# Altium PCB PCB_Interface_Board_7500-0428.PcbDoc (part 2 of 5)
Units mil, origin at the board's own origin, x right, y up, seen from the top; angles counter-clockwise.
Board outline 3850 x 4150 mil, 4 copper layers (Top Layer 1, GND+Signal, PWR+Signal, Bottom Layer 1), stack 62.449 mil thick; 247 components, 137 nets, 1675 pads, 241 vias.
Unrouted connection lines stored in the file: 122.
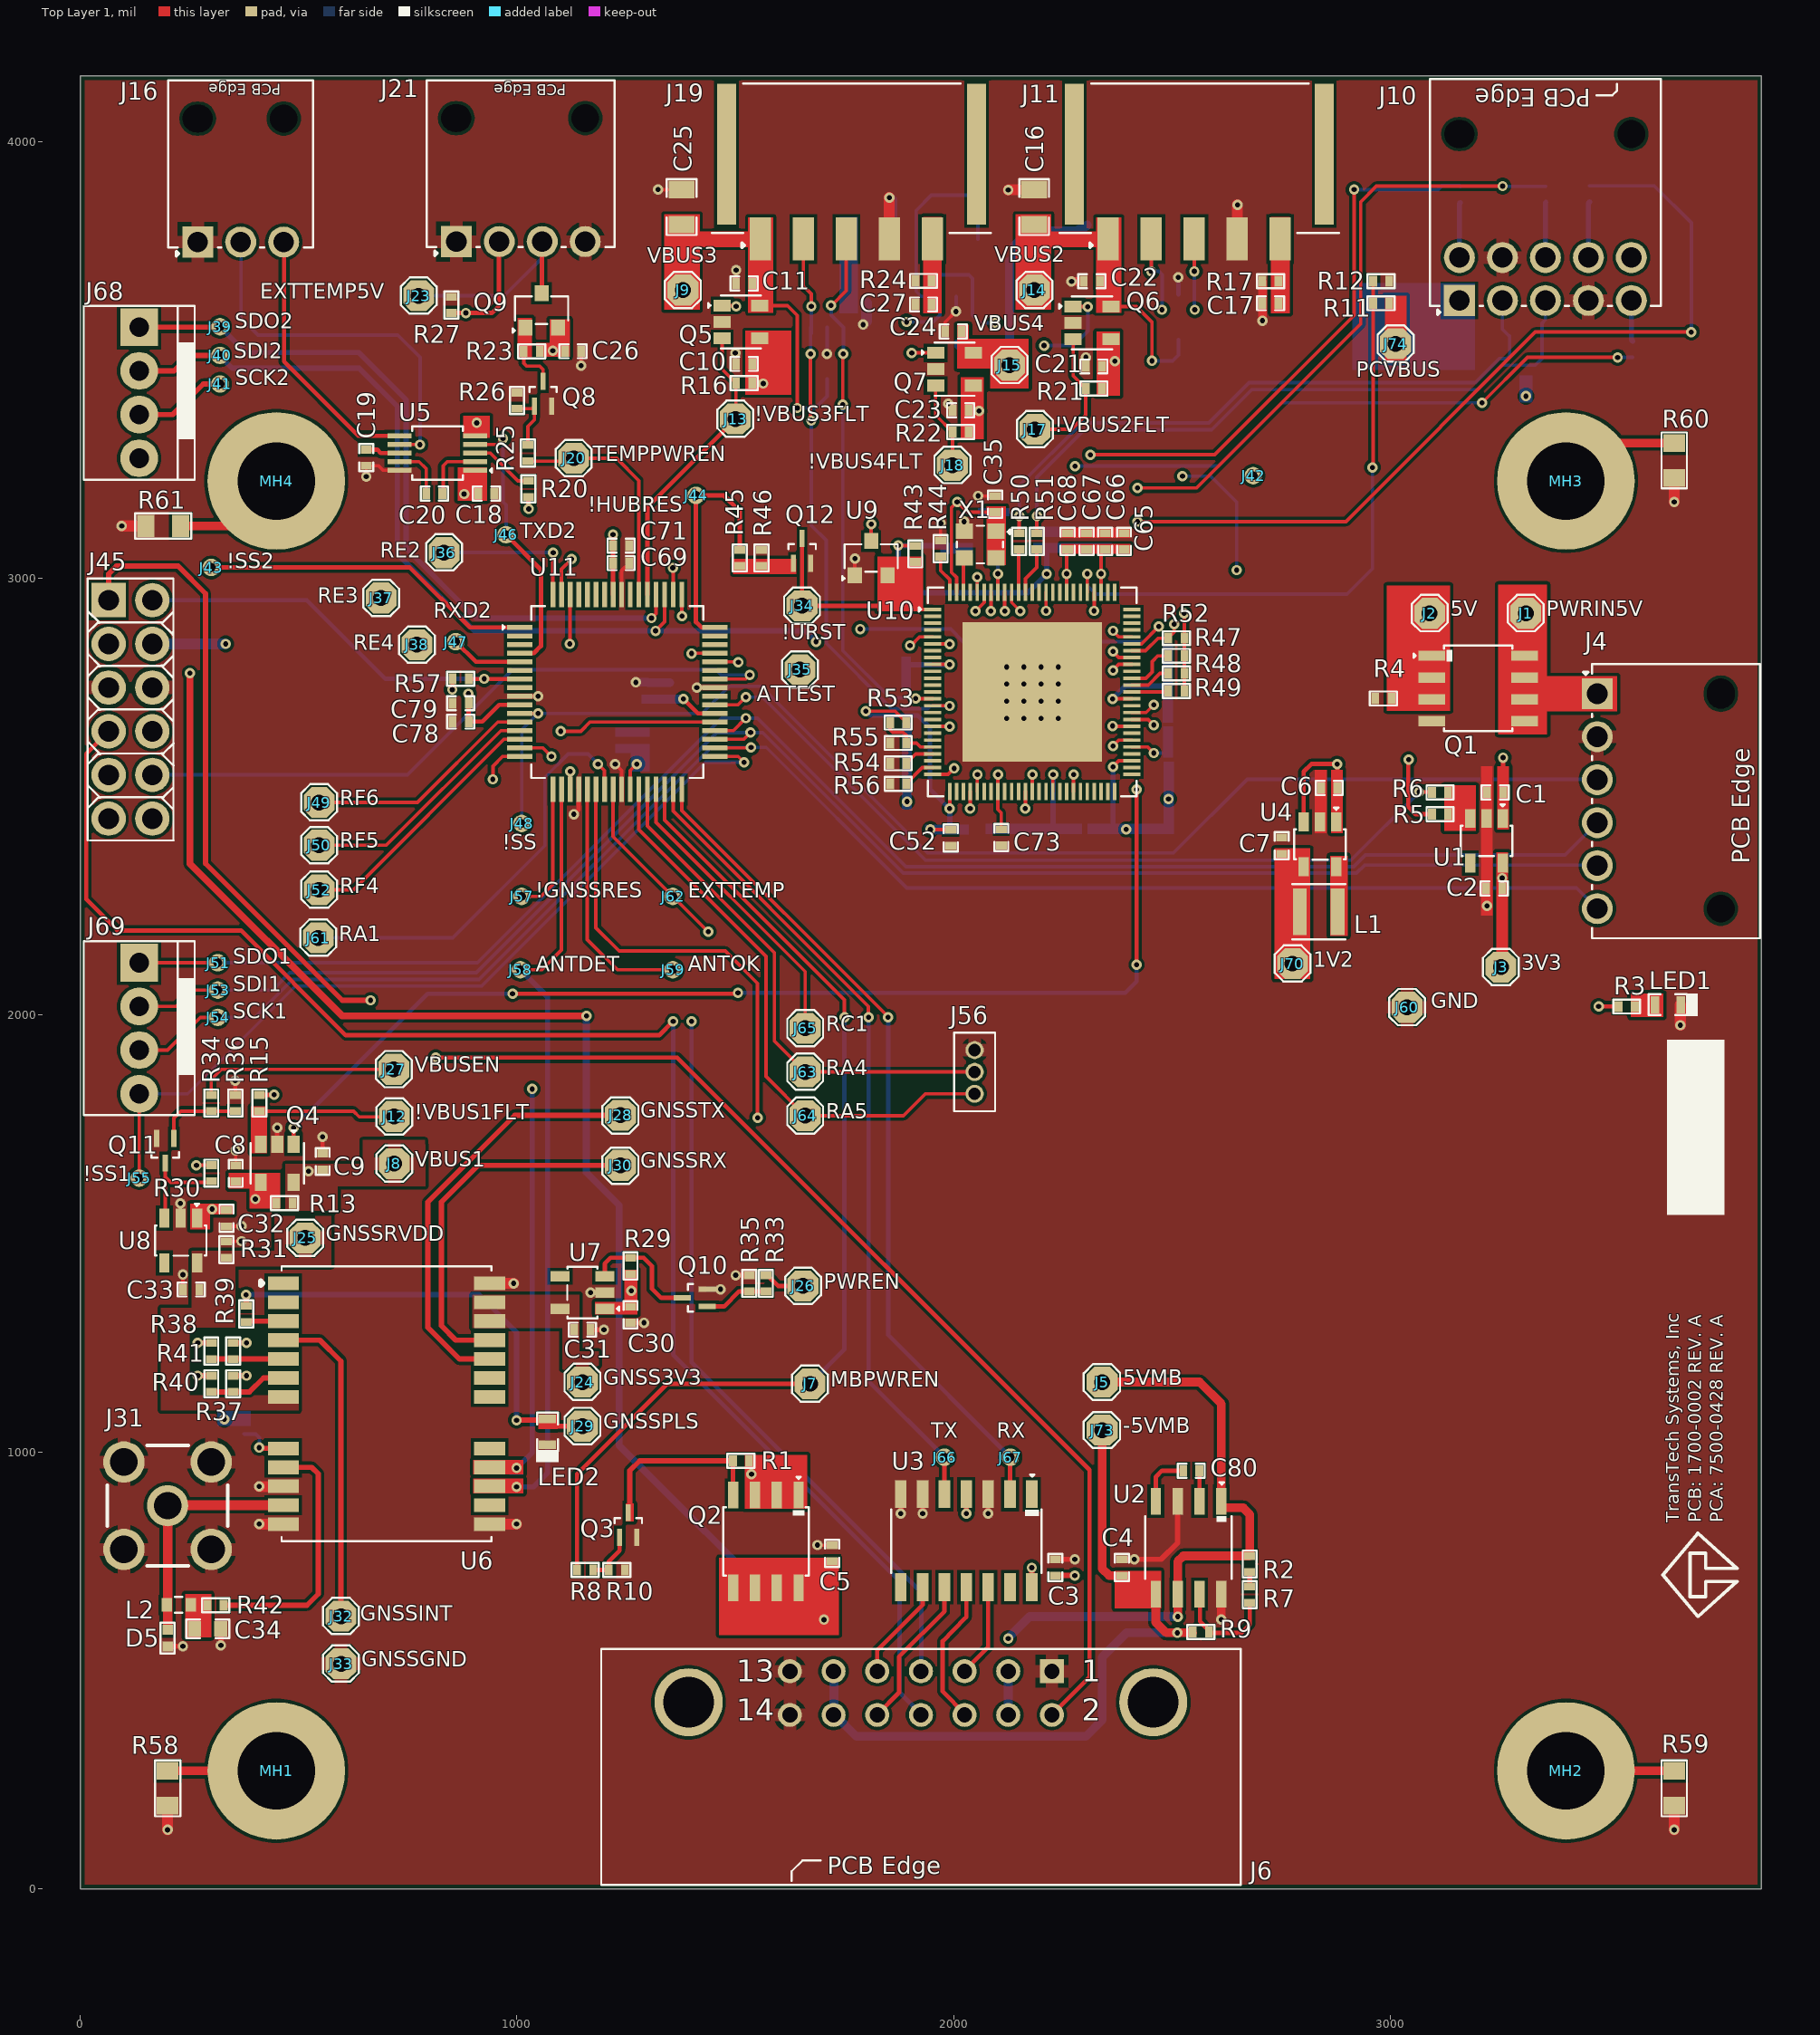
[diagram p0: Top Layer 1 view]

## Part data (continued)
J21: "CONN HEADER R/A 4POS 2.5MM", Current Rating=8A, Insulation Color=Black, Manufacturer=Molex, Max Operating Temperature=105°C, Min Operating Temperature=-40°C, Supplier Part Number=538-105313-1304, Voltage Rating=250V, ComponentLink1Description=http://www.farnell.com/datasheets/2788568.pdf?src-supplier=Farnell, ComponentLink1URL=http://www.farnell.com/datasheets/2788568.pdf?src-supplier=Farnell, ComponentLink2Description=http://www.farnell.com/datasheets/2788568.pdf?src-supplier=Newark, ComponentLink2URL=http://www.farnell.com/datasheets/2788568.pdf?src-supplier=Newark, ComponentLink3Description=https://www.molex.com/pdm_docs/sd/1053131102_sd.pdf?src-supplier=Digikey, ComponentLink3URL=https://www.molex.com/pdm_docs/sd/1053131102_sd.pdf?src-supplier=Digikey, Connector Type=Header, Contact Finish - Mating=GOLD, Contact Material=Brass, Contact Shape=Square, Contact Type="Male Pin", Fastening Type=Latch, Height=6.84mm, Insulation Material=Polymer, Item Type=Header, Manufacturer Part Number=105313-1304, Mounting Technology="Through Hole", Number of Circuits=4NUMBER, Number of Contacts=4NUMBER, Number of Positions=4, Number of Rows=1, Orientation=5492OrientationType, Packaging=Tray, Plating=154ConductorMaterial, Pricing="1=1.61, 10=1.45, 50=1.45, 100=1.26, 1000=1.11, 10000=1.11 (USD)", RoHS=Yes, RoHS Compliant=Yes, Series="Nano-Fit 105313", Stock=4079, Supplier=Mouser, Termination=Solder
J31: "CONN SMA JACK STR 50 OHM PCB", Frequency=20GHz, Manufacturer=Samtec, ComponentLink1Description=https://datasheet.ciiva.com/646/sma-j-p-x-st-th1-mkt-646059.pdf?src-supplier=Digikey, ComponentLink1URL=https://datasheet.ciiva.com/646/sma-j-p-x-st-th1-mkt-646059.pdf?src-supplier=Digikey, Item Type="RF / Coaxial Connectors", Manufacturer Part Number=SMA-J-P-H-ST-TH1, Number of Contacts=1NUMBER, Pricing="1=5.81, 25=5.03, 50=4.25 (USD)", RoHS=Yes, Stock=32413, Supplier="Arrow Electronics", Supplier Part Number=SMA-J-P-H-ST-TH1
J45: "2.54mm Pitch C-Grid III Header, Dual Row, Vertical, 12 Circuits, 0.10µm Gold (Au) Selective Plating", Color=Black, Flammability Rating="UL94 V-0", Manufacturer=Molex, Supplier Part Number=WM20588-ND, Category=Uncategorized, ComponentLink1Description=https://www.molex.com/pdm_docs/ps/PS-99020-0001-001.pdf?src-supplier=Digikey, ComponentLink1URL=https://www.molex.com/pdm_docs/ps/PS-99020-0001-001.pdf?src-supplier=Digikey, ComponentLink2Description=http://www.molex.com/pdm_docs/sd/901311086_sd.pdf?src-supplier=Digikey, ComponentLink2URL=http://www.molex.com/pdm_docs/sd/901311086_sd.pdf?src-supplier=Digikey, Contact Finish - Mating=GOLD, Contact Material=Brass, Contact Mating Length=0.266inch, Contact Plating=Gold, Contact Shape=Square, Contact Type="Male Pin", Fastening Type=Pull, Insulation Color=Black, Insulation Material=Glass, Item Type=Header, Manufacturer Part Number=0901311086, Mounting Technology="Through Hole", Number of Positions=12, Number of Rows=2, Packaging=Bulk, Pitch=0.1inch, Pricing="1=1.44, 10=1.224, 80=1.01075, 1200=0.79795, 6000=0.70752, 10800=0.69156 (USD)", RoHS=Yes, RoHS Compliant=Yes, Row Spacing=0.1inch, Series="C-Grid III™ 90131", Stock=1766, Supplier=Digikey, Termination=Solder
J56: "CONN HEADER VERT 3POS 1.27MM", Flammability Rating="UL94 V-0", Manufacturer=Sullins, Max Operating Temperature=105°C, Min Operating Temperature=-40°C, Supplier Part Number=S9014E-03-ND, ComponentLink1Description=https://datasheet.ciiva.com/726/71-grpb-1vwvn-rc-10957-c-726649.pdf?src-supplier=Digikey, ComponentLink1URL=https://datasheet.ciiva.com/726/71-grpb-1vwvn-rc-10957-c-726649.pdf?src-supplier=Digikey, Connector Type=Header, Contact Finish - Mating=GOLD, Contact Material=Brass, Contact Shape=Square, Contact Type="Male Pin", Fastening Type=Pull, Insulation Material=Nylon, Item Type=Connectors, Lead Free="Lead Free", Manufacturer Part Number=GRPB031VWVN-RC, Mounting Technology="Through Hole", Number of Positions=3, Number of Rows=1, Packaging=Bulk, Pitch=1.27mm, Pricing="1=0.28, 10=0.238, 100=0.185, 500=0.15862, 1000=0.13218, 5000=0.1133, 10000=0.1079 (USD)", RoHS=Yes, RoHS Compliant=Yes, Series=-, Stock=29991, Supplier=Digikey, Termination=Solder
J68 J69: "CONN HEADER VERT 4POS 2.54MM", Manufacturer=Molex, Supplier Part Number=WM10288-ND, ComponentLink1Description=https://datasheet.ciiva.com/24135/1718561004-pcb-headers-295430-24135941.pdf?src-supplier=Mouser, ComponentLink1URL=https://datasheet.ciiva.com/24135/1718561004-pcb-headers-295430-24135941.pdf?src-supplier=Mouser, ComponentLink2Description=https://datasheet.ciiva.com/29151/1718560002-sd-29151999.pdf?src-supplier=Digikey, ComponentLink2URL=https://datasheet.ciiva.com/29151/1718560002-sd-29151999.pdf?src-supplier=Digikey, Item Type=Header, Manufacturer Part Number=1718561004, Pricing="1=0.73, 10=0.617, 100=0.4796, 4000=0.34254, 8000=0.30829, 12000=0.30372 (USD)", RoHS=Yes, Supplier=Digikey
L1: library part NR3012T2R2M, "FIXED IND 2.2UH 1.2A 96 MOHM SMD", LCSC Part Number=C525010, Manufacturer="Taiyo Yuden", Supplier Part Number 1=587-1642-1-ND, ComponentLink1Description=https://datasheet.ciiva.com/8499/nr3012t2r2m-ss-8499238.pdf?src-supplier=Avnet, ComponentLink1URL=https://datasheet.ciiva.com/8499/nr3012t2r2m-ss-8499238.pdf?src-supplier=Avnet, ComponentLink2Description=https://datasheet.ciiva.com/1043/wound04-e-1043497.pdf?src-supplier=Digikey, ComponentLink2URL=https://datasheet.ciiva.com/1043/wound04-e-1043497.pdf?src-supplier=Digikey, ComponentLink3Description=https://datasheet.ciiva.com/1043/wound04-e-1043498.pdf?src-supplier=Digikey, ComponentLink3URL=https://datasheet.ciiva.com/1043/wound04-e-1043498.pdf?src-supplier=Digikey, ComponentLink4Description=https://datasheet.ciiva.com/1043/wound04-e-1043499.pdf?src-supplier=Digikey, ComponentLink4URL=https://datasheet.ciiva.com/1043/wound04-e-1043499.pdf?src-supplier=Digikey, ComponentLink5Description=https://datasheet.ciiva.com/8002/wound04-e-8002122.pdf?src-supplier=Element14, ComponentLink5URL=https://datasheet.ciiva.com/8002/wound04-e-8002122.pdf?src-supplier=Element14, Item Type=Inductors, Manufacturer Part Number=NR3012T2R2M, Pricing 1="1=0.24, 10=0.196, 25=0.1812, 50=0.166, 100=0.1463, 250=0.14184, 500=0.12674, 1000=0.10625 (USD)", RoHS=Yes, Stock 1=5366, Supplier 1=Digikey
L2: library part B82496C3270J000, "FIXED IND 27NH 360MA 550MOHM SMD", LCSC Part Number=C2046375, Manufacturer="TDK EPCOS", Supplier Part Number 1=495-2029-1-ND, ComponentLink1Description=https://datasheet.ciiva.com/22704/78400-22704383.pdf?src-supplier=Element14, ComponentLink1URL=https://datasheet.ciiva.com/22704/78400-22704383.pdf?src-supplier=Element14, ComponentLink2Description=https://datasheet.ciiva.com/22684/78400-22684183.pdf?src-supplier=Element14, ComponentLink2URL=https://datasheet.ciiva.com/22684/78400-22684183.pdf?src-supplier=Element14, Item Type=Inductor, Manufacturer Part Number=B82496C3270J000, Pricing 1="1=0.36, 10=0.291, 25=0.2688, 50=0.2464, 100=0.2172, 250=0.21052, 500=0.18814, 1000=0.1523 (USD)", RoHS=Yes, Stock 1=40469, Supplier 1=Digikey
LED1: library part NCD0603R3, "RED LED 0603 Light Emitting Diodes", LCSC Part Number=C3151730, Manufacturer="Foshan NationStar Optoelectronics", Package=0603, ComponentLink1Description=LCSC, ComponentLink1URL=https://www.lcsc.com/product-detail/Light-Emitting-Diodes-LED_Foshan-NationStar-Optoelectronics-NCD0603R3_C3151730.html, Item Type=LED, Manufacturer Part Number=NCD0603R3
LED2: library part NCD0603G2, "Emerald 0603 Light Emitting Diodes (LED) ROHS", LCSC Part Number=C87326, Manufacturer="Foshan NationStar Optoelectronics", Package=0603, ComponentLink1Description=LCSC, ComponentLink1URL=https://www.lcsc.com/product-detail/Light-Emitting-Diodes-LED_Foshan-NationStar-Optoelectronics-NCD0603G2_C87326.html, Item Type=LED, Manufacturer Part Number=NCD0603G2
MH1 MH2 MH3 MH4: "-", Item Type="Mounting Hole", Manufacturer Part Number="M4 Mounting Hole"
Q1 Q2: "20V 11.5A 12mΩ@11.5A,4.5V 1W 1.5V@250uA 1PCSPChannel SOIC-8 MOSFETs ROHS", Case/Package=SOIC, Continuous Drain Current (ID)=-11.5A, Drain to Source Breakdown Voltage=-20V, Drain to Source Resistance=10mR, Gate to Source Voltage (Vgs)=12V, LCSC Part Number=C3279922, Manufacturer="ON Semiconductor / Fairchild", Max Operating Temperature=150°C, Min Operating Temperature=-55°C, Package Quantity=2500, Power Dissipation=2.5W, ComponentLink1Description=http://components.arrow.com/part/dataview/3004105S7561270N7769?src-supplier=Arrow+Electronics, ComponentLink1URL=http://components.arrow.com/part/dataview/3004105S7561270N7769?src-supplier=Arrow+Electronics, Fall Time=60ns, Item Type=MOSFETs, Manufacturer Part Number=SI4463DY, Packaging="Tape and Reel", Pins=8, Polarity=P-CHANNEL, Pricing="472=0.62 (GBP)", Rise Time=15ns, RoHS=Yes, RoHS Compliant=Yes, Stock=188616, Supplier=Farnell, Turn-Off Delay Time=120ns
Q3 Q8 Q10 Q11 Q12: "Small Signal Bipolar Transistor, 0.6A I(C), 40V V(BR)CEO, 1-Element, NPN, Silicon", Manufacturer="ON Semiconductor", Supplier Part Number=MMBT2222ATT3GOSCT-ND, Category=BJTs, ComponentLink1Description=https://datasheet.ciiva.com/980/mmbt2222lt1-d-980718.pdf?src-supplier=Digikey, ComponentLink1URL=https://datasheet.ciiva.com/980/mmbt2222lt1-d-980718.pdf?src-supplier=Digikey, ComponentLink2Description=https://datasheet.ciiva.com/4724/mmbt2222att1-d-81771-4724629.pdf?src-supplier=Mouser, ComponentLink2URL=https://datasheet.ciiva.com/4724/mmbt2222att1-d-81771-4724629.pdf?src-supplier=Mouser, Manufacturer Part Number=MMBT2222ATT3G, Pricing="1=0.12, 10=0.082, 100=0.0441, 500=0.03466, 1000=0.02407, 2000=0.01994, 5000=0.01885 (USD)", RoHS=Yes, Stock=7029, Supplier=Digikey
Q4 Q5 Q6 Q7: "USBPOWERSWITCHTSOT25T&R3K", Manufacturer=Diodes, Supplier Part Number=31-AP22816BKAWT-7CT-ND, Item Type=IC, Manufacturer Part Number=AP22816BKAWT-7, Number of Channels=1NUMBER, Pricing="1=0.31, 10=0.248, 25=0.2264, 100=0.1686, 250=0.15276, 500=0.12644, 1000=0.09483 (USD)", RoHS=No, Stock=8685, Supplier=Digikey
Q9: "Transistor MOSFET P-CH 20V 3.1A 3-Pin SOT-23", Continuous Drain Current (ID)=-2.3A, Drain to Source Breakdown Voltage=-20V, Drain to Source Resistance=90mR, Gate to Source Voltage (Vgs)=8V, Manufacturer=Vishay, Max Operating Temperature=150°C, Min Operating Temperature=-55°C, Power Dissipation=860mW, Supplier Part Number=742-SI2301CDS-T1-BE3CT-ND, Category=MOSFETs, Drain to Source Voltage (Vdss)=-20V, Height=1.12mm, Manufacturer Part Number=SI2301CDS-T1-BE3, Number of Channels=1NUMBER, Pricing="1=0.37, 10=0.289, 100=0.1734, 500=0.1606, 1000=0.1092 (USD)", RoHS=Yes, Stock=6842, Supplier=Digikey, Turn-Off Delay Time=30ns, Turn-On Delay Time=11ns
R1 R2 R4 R10 R15 R16 R20 R21 R22 R23 R26 R29 R30 R31 R35 R36 R46 R47 R48 R49 R52 R53 R55 R56 R57: library part RT0402BRD0710KL, "RES SMD 10K OHM 0.1% 1/16W 0402", LCSC Part Number=C190095, Manufacturer=Yageo, Supplier Part Number=1236728, Category="Chip SMD Resistors", ComponentLink1Description=https://datasheet.ciiva.com/12836/pyu-rt-1-to-0-05-rohs-l-4-12836454.pdf?src-supplier=Mouser, ComponentLink1URL=https://datasheet.ciiva.com/12836/pyu-rt-1-to-0-05-rohs-l-4-12836454.pdf?src-supplier=Mouser, Item Type=Resistor, Manufacturer Part Number=RT0402BRD0710KL, Pricing="10000=0.0218, 20000=0.0213, 30000=0.021, 50000=0.0206, 100000=0.0199 (USD)", RoHS=Yes, Stock=490000, Supplier="Future Electronics"
R3: library part ERJ-2GEJ132X, "RES SMD 1.3K OHM 5% 1/10W 0402"
R5 R6 R13 R50 R51: library part RCS04020000Z0ED, "RES SMD 0 OHM JUMPER 1/5W 0402", Case Code (Imperial)=0402, Case Code (Metric)=1005, LCSC Part Number=C844673, Manufacturer="Vishay Dale", Max Operating Temperature=155°C, Max Power Dissipation=200mW, Min Operating Temperature=-55°C, Resistance=0mR, Resistor Type="Thick Film", Supplier Part Number 1=541-2877-1-ND, Case/Package=0402, ComponentLink1Description=http://www.farnell.com/datasheets/2618474.pdf?src-supplier=Farnell, ComponentLink1URL=http://www.farnell.com/datasheets/2618474.pdf?src-supplier=Farnell, ComponentLink2Description=http://www.farnell.com/datasheets/2618474.pdf?src-supplier=Element14, ComponentLink2URL=http://www.farnell.com/datasheets/2618474.pdf?src-supplier=Element14, ComponentLink3Description=http://www.vishay.com/docs/20065/rcse3.pdf?src-supplier=Digi-Key, ComponentLink3URL=http://www.vishay.com/docs/20065/rcse3.pdf?src-supplier=Digi-Key, ComponentLink4Description=http://www.farnell.com/datasheets/2618474.pdf?src-supplier=Newark, ComponentLink4URL=http://www.farnell.com/datasheets/2618474.pdf?src-supplier=Newark, Features="Automotive AEC-Q200", Height=0.016inch, Item Type=Resistor, Length=0.039inch, Manufacturer Part Number=RCS04020000Z0ED, Number of Terminations=2, Packaging="Tape and Reel", Pricing 1="1=0.1, 10=0.083, 25=0.0576, 50=0.0448, 100=0.032, 250=0.02496, 500=0.01984, 1000=0.01408, 5000=0.01088 (USD)", RoHS Compliant=Yes, Stock 1=35470, Supplier 1=Digi-Key, Width=0.02inch
R7 R9 R43: library part RT0402BRD07100KL, "RES SMD 100K OHM 0.1% 1/16W 0402", LCSC Part Number=C852472, Manufacturer=Yageo, Supplier Part Number=YAG1343CT-ND, Voltage Rating (DC)=50V, Category="Chip SMD Resistors", ComponentLink1Description=https://datasheet.ciiva.com/12724/pyu-rt-1-to-0-05-rohs-l-4-12724954.pdf?src-supplier=Mouser, ComponentLink1URL=https://datasheet.ciiva.com/12724/pyu-rt-1-to-0-05-rohs-l-4-12724954.pdf?src-supplier=Mouser, Item Type=Resistor, Manufacturer Part Number=RT0402BRD07100KL, Pricing="1=0.16, 10=0.121, 50=0.0958, 100=0.0859, 500=0.0654, 1000=0.0578, 5000=0.04283 (USD)", RoHS=Yes, Stock=62932, Supplier=Digikey
R8 R25 R33 R34 R45: library part RC0402FR-071KL, "RES 1K OHM 1% 1/16W 0402", Case Code (Imperial)=0402, Case Code (Metric)=1005, LCSC Part Number=C106235, Manufacturer=Yageo, Max Operating Temperature=155°C, Max Power Dissipation=63mW, Min Operating Temperature=-55°C, Power Rating=62.5mW, Resistance=1kR, Resistance Tolerance=1%, Resistor Type="Thick Film", Temperature Coefficient=100ppm/°C, Voltage Rating=50V, Case/Package=0402, Category="Chip SMD Resistors", ComponentLink1Description=https://datasheet.ciiva.com/11819/0900766b80c66297-11819477.pdf?src-supplier=RSComponents, ComponentLink1URL=https://datasheet.ciiva.com/11819/0900766b80c66297-11819477.pdf?src-supplier=RSComponents, ComponentLink2Description=https://datasheet.ciiva.com/7983/1018594-7983502.pdf?src-supplier=Element14, ComponentLink2URL=https://datasheet.ciiva.com/7983/1018594-7983502.pdf?src-supplier=Element14, ComponentLink3Description=https://datasheet.ciiva.com/22747/1018594-22747513.pdf?src-supplier=Element14, ComponentLink3URL=https://datasheet.ciiva.com/22747/1018594-22747513.pdf?src-supplier=Element14, ComponentLink4Description=https://datasheet.ciiva.com/12666/pyu-rc0402-51-rohs-l-6-r-12666741.pdf?src-supplier=Mouser, ComponentLink4URL=https://datasheet.ciiva.com/12666/pyu-rc0402-51-rohs-l-6-r-12666741.pdf?src-supplier=Mouser, ComponentLink5Description=https://datasheet.ciiva.com/7849/1018594-7849869.pdf?src-supplier=Element14, ComponentLink5URL=https://datasheet.ciiva.com/7849/1018594-7849869.pdf?src-supplier=Element14, ComponentLink6Description=https://datasheet.ciiva.com/7849/1018594-7849871.pdf?src-supplier=Element14, ComponentLink6URL=https://datasheet.ciiva.com/7849/1018594-7849871.pdf?src-supplier=Element14, ComponentLink7Description=https://datasheet.ciiva.com/17063/pyu-rc0402-51-rohs-l-6-r-17063193.pdf?src-supplier=Future+Electronics, ComponentLink7URL=https://datasheet.ciiva.com/17063/pyu-rc0402-51-rohs-l-6-r-17063193.pdf?src-supplier=Future+Electronics, Construction=Rectangular, Depth=0.5mm, Features="Moisture Resistant", Height=0.32mm, Item Type=Resistor, Lead Free="Lead Free", Length=1mm, Manufacturer Part Number=RC0402FR-071KL, Military Standard=Not, Number of Pins=2, Number of Terminations=2, Packaging="Tape and Reel", Pricing 1="10000=0.00085, 20000=0.00087, 40000=0.00084, 60000=0.00083, 80000=0.00079, 100000=0.00078, 1000000=0.00076 (USD)", Reach SVHC Compliant=Yes, RoHS=Yes, RoHS Compliant=Yes, Series=RC, Size Code=0402, Stock 1=13030000, Supplier 1=Avnet, Supplier Part Number 1=RC0402FR-071KL, Technology="THICK FILM", Termination=SMD/SMT, Tolerance=1%, Voltage Rating (DC)=50V, Width=0.5mm
R11: library part RC0402FR-0743KL, "RES 43K OHM 1% 1/16W 0402", Case Code (Imperial)=0402, Case Code (Metric)=1005, LCSC Part Number=C185415, Manufacturer=Yageo, Max Operating Temperature=155°C, Max Power Dissipation=63mW, Min Operating Temperature=-55°C, Package Quantity=1, Resistance=43kR, Resistance Tolerance=1%, Resistor Type="Thick Film", Supplier Part Number 1=311-43.0KLRCT-ND, Temperature Coefficient=100ppm/°C, Voltage Rating=50V, Case/Package=0402, Category="Chip SMD Resistors", ComponentLink1Description=https://datasheet.ciiva.com/11819/0900766b80c66297-11819515.pdf?src-supplier=RSComponents, ComponentLink1URL=https://datasheet.ciiva.com/11819/0900766b80c66297-11819515.pdf?src-supplier=RSComponents, ComponentLink2Description=https://datasheet.ciiva.com/7850/1018594-7850009.pdf?src-supplier=Element14, ComponentLink2URL=https://datasheet.ciiva.com/7850/1018594-7850009.pdf?src-supplier=Element14, ComponentLink3Description=https://datasheet.ciiva.com/7850/1018594-7850008.pdf?src-supplier=Element14, ComponentLink3URL=https://datasheet.ciiva.com/7850/1018594-7850008.pdf?src-supplier=Element14, ComponentLink4Description=https://datasheet.ciiva.com/2453/pyu-r-int-thick-7-2453665.pdf?src-supplier=Digi-Key, ComponentLink4URL=https://datasheet.ciiva.com/2453/pyu-r-int-thick-7-2453665.pdf?src-supplier=Digi-Key, ComponentLink5Description=https://datasheet.ciiva.com/2453/pyu-r-int-thick-7-2453666.pdf?src-supplier=Digi-Key, ComponentLink5URL=https://datasheet.ciiva.com/2453/pyu-r-int-thick-7-2453666.pdf?src-supplier=Digi-Key, ComponentLink6Description=https://datasheet.ciiva.com/2453/pyu-r-int-thick-7-2453664.pdf?src-supplier=Digi-Key, ComponentLink6URL=https://datasheet.ciiva.com/2453/pyu-r-int-thick-7-2453664.pdf?src-supplier=Digi-Key, Construction=Rectangular, Depth=0.5mm, Features="Moisture Resistant", Height=0.016inch, Item Type=Resistor, Lead Free="Lead Free", Length=1mm, Manufacturer Part Number=RC0402FR-0743KL, Military Standard=Not, Number of Terminations=2, Packaging="Tape and Reel", Power Rating=63mW, Pricing 1="1=0.10000, 10=0.01400, 100=0.00580, 1000=0.00262, 2500=0.00228, 5000=0.00188 (USD)", RoHS=Yes, RoHS Compliant=Yes, Series=RC, Size Code=0402, Stock 1=923044, Supplier 1=Digi-Key, Technology="THICK FILM", Termination=SMD/SMT, Tolerance=1%, Voltage Rating (DC)=50V, Weight=2.3E-05oz, Width=0.02inch
R12: library part RC0402FR-0749K9L, "RES 49.9K OHM 1% 1/16W 0402", Case Code (Imperial)=0402, Case Code (Metric)=1005, LCSC Part Number=C137969, Manufacturer=Yageo, Max Operating Temperature=155°C, Max Power Dissipation=63mW, Min Operating Temperature=-55°C, Power Rating=62.5mW, Supplier Part Number=311-49.9KLRCT-ND, Temperature Coefficient=100ppm/°C, Tolerance=1%, Voltage Rating=50V, Case/Package=0402, Category="Chip SMD Resistors", ComponentLink1Description=https://datasheet.ciiva.com/17071/pyu-rc0402-51-rohs-l-6-r-17071066.pdf?src-supplier=Future+Electronics, ComponentLink1URL=https://datasheet.ciiva.com/17071/pyu-rc0402-51-rohs-l-6-r-17071066.pdf?src-supplier=Future+Electronics, Construction=Rectangular, Depth=0.5mm, Features="Moisture Resistant", Item Type=Resistor, Lead Free="Lead Free", Length=1mm, Manufacturer Part Number=RC0402FR-0749K9L, Military Standard=Not, Number of Terminations=2, Packaging="Tape and Reel", Pricing="1=0.1, 10=0.015, 50=0.0088, 100=0.0073, 500=0.00488, 1000=0.00417, 5000=0.00297 (USD)", RoHS=Yes, RoHS Compliant=Yes, Series=RC, Stock=5084418, Supplier=Digikey, Termination=SMD/SMT, Voltage Rating (DC)=50V
R17 R24 R28: library part CRCW0402330RFKEDC, "SMD Chip Resistor, 330 Ohm, ± 1%, 63 mW, 0402 [1005 Metric], Thick Film, General Purpose", Case Code (Imperial)=0402, Case Code (Metric)=1005, Manufacturer="Vishay Semiconductors", Max Operating Temperature=155°C, Max Power Dissipation=63mW, Min Operating Temperature=-55°C, Supplier Part Number=541-3996-1-ND, Temperature Coefficient=100ppm/°C, Tolerance=1%, Case/Package=0402, Category="Chip SMD Resistors", ComponentLink1Description=http://www.vishay.com/docs/28773/crcwce3.pdf?src-supplier=Digikey, ComponentLink1URL=http://www.vishay.com/docs/28773/crcwce3.pdf?src-supplier=Digikey, Lead Free="Lead Free", Manufacturer Part Number=CRCW0402330RFKEDC, Number of Terminations=2, Packaging="Tape and Reel", Pricing="1=0.1, 10=0.024, 50=0.0152, 100=0.0127, 500=0.00866, 1000=0.00746, 5000=0.00542 (USD)", RoHS=Yes, RoHS Compliant=Yes, Series=CRCW-C, Stock=59136, Supplier=Digikey
R27: library part RTT021004BTH, "62.5mW Thick Film Resistors ±100ppm/℃ ±0.1% 1MΩ 0402 Chip Resistor - Surface Mount ROHS", LCSC Part Number=C525710, Manufacturer=RALEC, Package=0402, ComponentLink1Description=LCSC, ComponentLink1URL=https://www.lcsc.com/product-detail/Chip-Resistor-Surface-Mount_RALEC-RTT021004BTH_C525710.html, Item Type=Resistor, Manufacturer Part Number=RTT021004BTH
R32: library part RMCF0402FT11K0, "Res Thick Film 0402 11K Ohm 1% 0.063W(1/16W) ±100ppm/C Pad SMD Automotive T/R", Case Code (Imperial)=0402, Case Code (Metric)=1005, Manufacturer="Stackpole Electronics", Max Operating Temperature=155°C, Max Power Dissipation=63mW, Min Operating Temperature=-55°C, Ratings=AEC-Q200, Supplier Part Number=RMCF0402FT11K0DKR-ND, Temperature Coefficient=100ppm/°C, Tolerance=1%, Case/Package=0402, Category="Chip SMD Resistors", ComponentLink1Description=http://components.arrow.com/part/dataview/50581462S9720773N1174?src-supplier=Arrow+Electronics, ComponentLink1URL=http://components.arrow.com/part/dataview/50581462S9720773N1174?src-supplier=Arrow+Electronics, ComponentLink2Description=https://www.seielect.com/catalog/SEI-RMCF_RMCP.pdf?src-supplier=Avnet, ComponentLink2URL=https://www.seielect.com/catalog/SEI-RMCF_RMCP.pdf?src-supplier=Avnet, ComponentLink3Description=https://www.seielect.com/catalog/SEI-Packaging.pdf?src-supplier=Digikey, ComponentLink3URL=https://www.seielect.com/catalog/SEI-Packaging.pdf?src-supplier=Digikey, Contact Plating=Tin,Matte, Features="Automotive AEC-Q200", Height=0.016inch, Lead Free="Lead Free", Length=0.039inch, Manufacturer Part Number=RMCF0402FT11K0, Mounting Technology="Surface Mount", Number of Terminations=2, Packaging="Tape and Reel", Pricing="1=0.1, 10=0.021, 50=0.0116, 100=0.0093, 500=0.00594, 1000=0.005, 5000=0.00345 (USD)", Radiation Hardening=No, RoHS=Yes, RoHS Compliant=Yes, Series=RMCF, Stock=3070, Supplier=Digikey, Width=0.02inch
R37 R38 R40 R41: library part CRGCQ0402F27R, "SMD Chip Resistor, 27 Ohm, ± 1%, 63 mW, 0402 [1005 Metric], Thick Film, General Purpose", Manufacturer="TE Connectivity", Operating Supply Voltage=50V, Power Rating=62.5mW, Supplier Part Number=A129608CT-ND, Category="Chip SMD Resistors", ComponentLink1Description=http://datasheet.octopart.com/CRGCQ0402F27R-TE-Connectivity-datasheet-114679081.pdf?src-supplier=Farnell, ComponentLink1URL=http://datasheet.octopart.com/CRGCQ0402F27R-TE-Connectivity-datasheet-114679081.pdf?src-supplier=Farnell, ComponentLink2Description=http://datasheet.octopart.com/CRGCQ0402F27R-TE-Connectivity-datasheet-114679081.pdf?src-supplier=Mouser, ComponentLink2URL=http://datasheet.octopart.com/CRGCQ0402F27R-TE-Connectivity-datasheet-114679081.pdf?src-supplier=Mouser, ComponentLink3Description=http://datasheet.octopart.com/CRGCQ0402F27R-TE-Connectivity-datasheet-114679081.pdf?src-supplier=Avnet, ComponentLink3URL=http://datasheet.octopart.com/CRGCQ0402F27R-TE-Connectivity-datasheet-114679081.pdf?src-supplier=Avnet, ComponentLink4Description=https://www.te.com/commerce/DocumentDelivery/DDEController?Action=srchrtrv&amp;DocNm=1773204-3&amp;DocType=DS&amp;DocLang=English&src-supplier=Digikey, ComponentLink4URL=https://www.te.com/commerce/DocumentDelivery/DDEController?Action=srchrtrv&amp;DocNm=1773204-3&amp;DocType=DS&amp;DocLang=English&src-supplier=Digikey, ComponentLink5Description=http://datasheet.octopart.com/CRGCQ0402F27R-TE-Connectivity-datasheet-114679081.pdf?src-supplier=Digikey, ComponentLink5URL=http://datasheet.octopart.com/CRGCQ0402F27R-TE-Connectivity-datasheet-114679081.pdf?src-supplier=Digikey, ComponentLink6Description=http://datasheet.octopart.com/CRGCQ0402F27R-TE-Connectivity-datasheet-114679081.pdf?src-supplier=Newark, ComponentLink6URL=http://datasheet.octopart.com/CRGCQ0402F27R-TE-Connectivity-datasheet-114679081.pdf?src-supplier=Newark, ComponentLink7Description=http://datasheet.octopart.com/CRGCQ0402F27R-TE-Connectivity-datasheet-114679081.pdf?src-supplier=Verical, ComponentLink7URL=http://datasheet.octopart.com/CRGCQ0402F27R-TE-Connectivity-datasheet-114679081.pdf?src-supplier=Verical, ComponentLink8Description=http://datasheet.octopart.com/CRGCQ0402F27R-TE-Connectivity-datasheet-114679081.pdf?src-supplier=Arrow+Electronics, ComponentLink8URL=http://datasheet.octopart.com/CRGCQ0402F27R-TE-Connectivity-datasheet-114679081.pdf?src-supplier=Arrow+Electronics, ComponentLink9Description=http://datasheet.octopart.com/CRGCQ0402F27R-TE-Connectivity-datasheet-114679081.pdf?src-supplier=Onlinecomponents.com, ComponentLink9URL=http://datasheet.octopart.com/CRGCQ0402F27R-TE-Connectivity-datasheet-114679081.pdf?src-supplier=Onlinecomponents.com, ComponentLink10Description=http://datasheet.octopart.com/CRGCQ0402F27R-TE-Connectivity-datasheet-114679081.pdf?src-supplier=Sager+Electronics, ComponentLink10URL=http://datasheet.octopart.com/CRGCQ0402F27R-TE-Connectivity-datasheet-114679081.pdf?src-supplier=Sager+Electronics, ComponentLink11Description=http://datasheet.octopart.com/CRGCQ0402F27R-TE-Connectivity-datasheet-114679081.pdf?src-supplier=Electro+Sonic, ComponentLink11URL=http://datasheet.octopart.com/CRGCQ0402F27R-TE-Connectivity-datasheet-114679081.pdf?src-supplier=Electro+Sonic, ComponentLink12Description=http://datasheet.octopart.com/CRGCQ0402F27R-TE-Connectivity-datasheet-114679081.pdf?src-supplier=Heilind+Electronics, ComponentLink12URL=http://datasheet.octopart.com/CRGCQ0402F27R-TE-Connectivity-datasheet-114679081.pdf?src-supplier=Heilind+Electronics, ComponentLink13Description=http://datasheet.octopart.com/CRGCQ0402F27R-TE-Connectivity-datasheet-114679081.pdf?src-supplier=Interstate+Connecting+Components, ComponentLink13URL=http://datasheet.octopart.com/CRGCQ0402F27R-TE-Connectivity-datasheet-114679081.pdf?src-supplier=Interstate+Connecting+Components, ComponentLink14Description=https://datasheet.octopart.com/CRGCQ0402F27R-TE-Connectivity-datasheet-114679081.pdf?src-supplier=Master+Electronics, ComponentLink14URL=https://datasheet.octopart.com/CRGCQ0402F27R-TE-Connectivity-datasheet-114679081.pdf?src-supplier=Master+Electronics, ComponentLink15Description=http://datasheet.octopart.com/CRGCQ0402F27R-TE-Connectivity-datasheet-114679081.pdf?src-supplier=TME, ComponentLink15URL=http://datasheet.octopart.com/CRGCQ0402F27R-TE-Connectivity-datasheet-114679081.pdf?src-supplier=TME, Height=400um, Manufacturer Part Number=CRGCQ0402F27R, Pricing="1=0.1, 10=0.02, 50=0.0126, 100=0.0105, 500=0.00708, 1000=0.00609, 5000=0.00442 (USD)", RoHS=Yes, Stock=81404, Supplier=Digikey, Voltage Rating=50V, Voltage Rating (DC)=50V
R39: library part RC0402FR-07100RL, "RES 100 OHM 1% 1/16W 0402", Case Code (Imperial)=0402, Case Code (Metric)=1005, LCSC Part Number=C106232, Manufacturer=Yageo, Max Operating Temperature=155°C, Max Power Dissipation=63mW, Min Operating Temperature=-55°C, Power Rating=62.5mW, Resistance Tolerance=1%, Resistor Type="Thick Film", Supplier Part Number 1=603-RC0402FR-07100RL, Temperature Coefficient=100ppm/°C, Voltage Rating=50V, Case/Package=0402, Category="Chip SMD Resistors", ComponentLink1Description=https://datasheet.ciiva.com/11808/0900766b80c66297-11808765.pdf?src-supplier=RSComponents, ComponentLink1URL=https://datasheet.ciiva.com/11808/0900766b80c66297-11808765.pdf?src-supplier=RSComponents, ComponentLink2Description=https://datasheet.ciiva.com/7849/1784430-7849810.pdf?src-supplier=Element14, ComponentLink2URL=https://datasheet.ciiva.com/7849/1784430-7849810.pdf?src-supplier=Element14, ComponentLink3Description=https://datasheet.ciiva.com/28367/1018594-28367226.pdf?src-supplier=Element14, ComponentLink3URL=https://datasheet.ciiva.com/28367/1018594-28367226.pdf?src-supplier=Element14, ComponentLink4Description=https://datasheet.ciiva.com/22747/1018594-22747511.pdf?src-supplier=Element14, ComponentLink4URL=https://datasheet.ciiva.com/22747/1018594-22747511.pdf?src-supplier=Element14, ComponentLink5Description=https://datasheet.ciiva.com/12667/pyu-rc0402-51-rohs-l-6-r-12667957.pdf?src-supplier=Mouser, ComponentLink5URL=https://datasheet.ciiva.com/12667/pyu-rc0402-51-rohs-l-6-r-12667957.pdf?src-supplier=Mouser, ComponentLink6Description=https://datasheet.ciiva.com/15189/getdatasheetpartid-329466-15189335.pdf?src-supplier=Verical, ComponentLink6URL=https://datasheet.ciiva.com/15189/getdatasheetpartid-329466-15189335.pdf?src-supplier=Verical, ComponentLink7Description=https://datasheet.ciiva.com/16740/pyu-rc0402-51-rohs-l-6-r-16740566.pdf?src-supplier=Future+Electronics, ComponentLink7URL=https://datasheet.ciiva.com/16740/pyu-rc0402-51-rohs-l-6-r-16740566.pdf?src-supplier=Future+Electronics, Construction=Rectangular, Depth=0.5mm, Features="Moisture Resistant", Height=0.32mm, Item Type=Resistor, Lead Free="Lead Free", Length=1mm, Manufacturer Part Number=RC0402FR-07100RL, Military Standard=Not, Number of Pins=2, Number of Terminations=2, Packaging="Tape and Reel", Pricing 1="1=0.10000, 10=0.01200, 50=0.01200, 100=0.00500, 1000=0.00300, 2500=0.00200, 10000=0.00100 (USD)", REACH SVHC="No SVHC", Resistance=100R, RoHS=Yes, RoHS Compliant=Yes, Series=RC, Size Code=0402, Stock 1=699545, Supplier 1=Mouser, Technology="THICK FILM", Termination=SMD/SMT, Tolerance=1%, Voltage Rating (DC)=50V, Width=0.5mm
R42: library part CRCW040210R0FKEDHP, "RES SMD 10 OHM 1% 1/5W 0402", Case Code (Imperial)=0402, Case Code (Metric)=1005, LCSC Part Number=C4013850, Manufacturer="Vishay Dale", Max Operating Temperature=155°C, Max Power Dissipation=200mW, Min Operating Temperature=-55°C, Package Quantity=10000, Power Rating=125mW, Resistance Tolerance=1%, Resistor Type="Thick Film", Supplier Part Number 1=541-10.0YCT-ND, Temperature Coefficient=100ppm/°C, Voltage Rating=50V, Case/Package=0402, ComponentLink1Description=http://www.mouser.com/ds/2/427/crcwhpe3-46056.pdf?src-supplier=Mouser, ComponentLink1URL=http://www.mouser.com/ds/2/427/crcwhpe3-46056.pdf?src-supplier=Mouser, Construction=Rectangular, Contact Plating=Tin, Depth=0.5mm, Features="Automotive AEC-Q200", Height=0.3mm, Lead Free="Lead Free", Length=1mm, Manufacturer Part Number=CRCW040210R0FKEDHP, Military Standard=Not, Mount="Surface Mount", Number of Terminations=2, Packaging="Tape and Reel", Pricing 1="1=0.15, 10=0.132, 100=0.0506, 1000=0.02226, 2500=0.01923, 5000=0.0172 (USD)", Radiation Hardening=No, REACH SVHC=Unknown, Resistance=10R, RoHS Compliant=Yes, Series=CRCW-HP, Stock 1=28500, Supplier 1=Digi-Key, Technology="THICK FILM", Termination=SMD/SMT, Tolerance=1%, Voltage Rating (DC)=50V, Weight=2.3E-05oz, Width=0.5mm